# Altium PCB Lamps_board.PcbDoc (part 1 of 2)
Units mm, origin at the board's own origin, x right, y up, seen from the top; angles counter-clockwise.
Board outline 106 x 36 mm, 2 copper layers (Top Layer, Bottom Layer), stack 1.671 mm thick; 111 components, 90 nets, 292 pads, 89 vias.
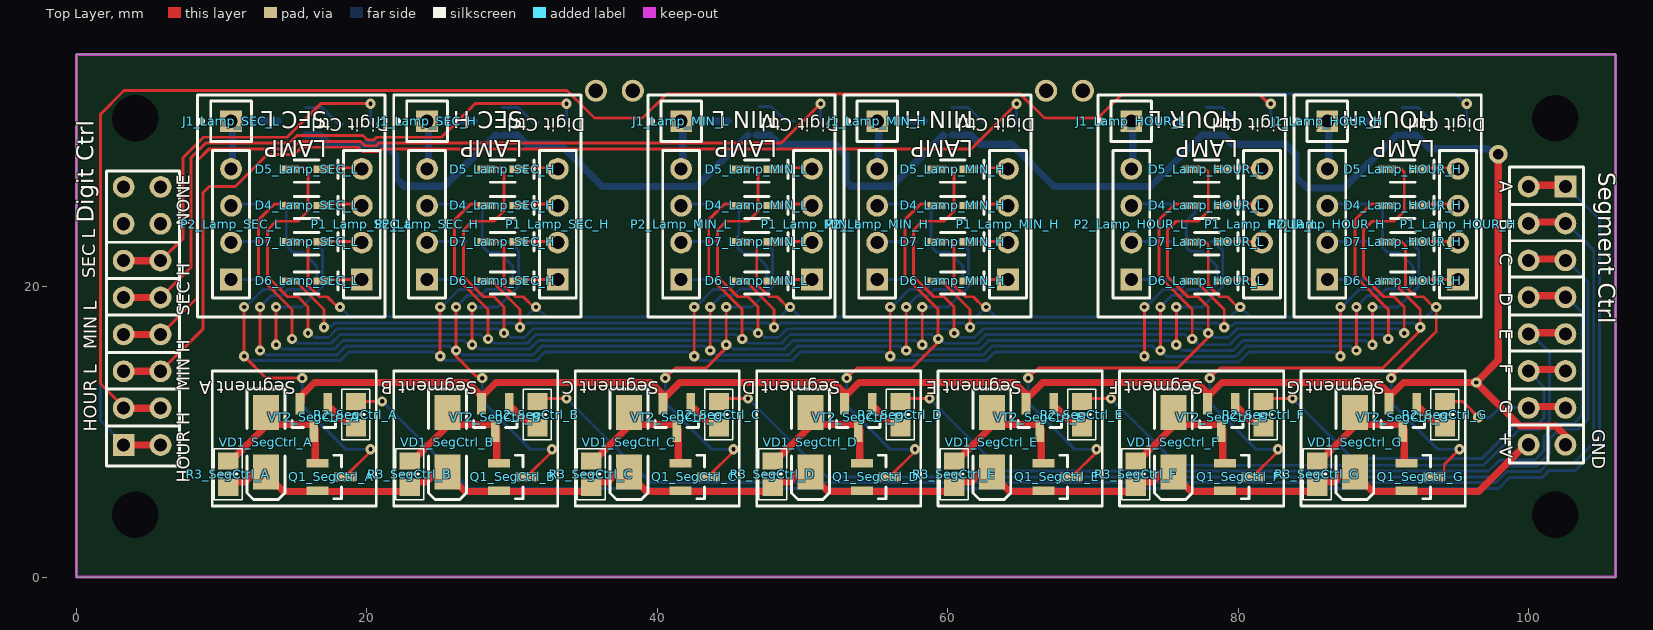
[diagram p0: Top Layer view]
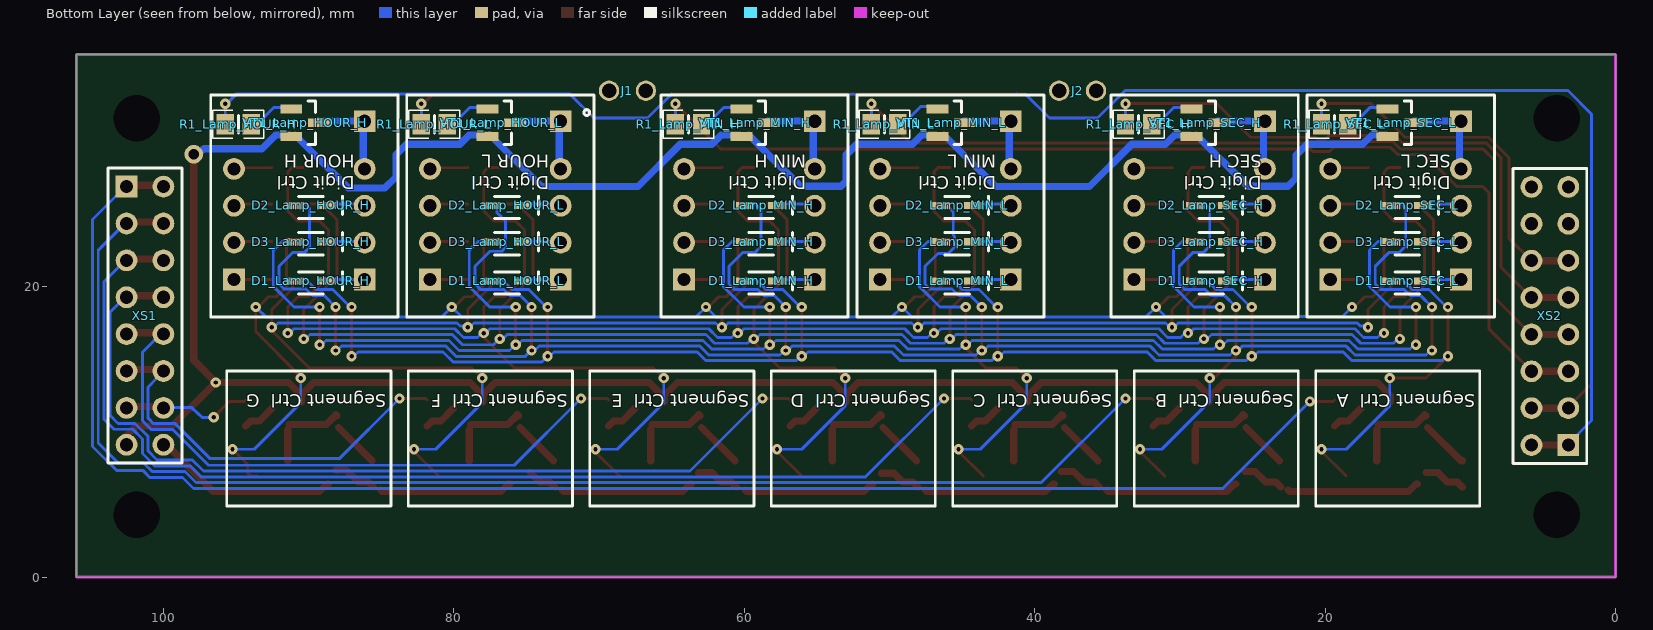
[diagram p1: Bottom Layer view, seen from below]

## Layer stack, top to bottom
Top Solder: solder mask 0.01, Solder Resist, Dk 3.5
Top Layer: signal copper 0.0356
Dielectric 1: dielectric 1.6, FR-4, Dk 4.8
Bottom Layer: signal copper 0.0356
Bottom Solder: solder mask 0.01, Solder Resist, Dk 3.5

## Board outline
0,0 0,36 106,36 106,0

## Design rules (kind name [scope] priority, off if disabled: settings)
BoardOutlineClearance [All] p1: gap=0.2 ignorepadtopadclearanceinfootprint=FALSE
Clearance Pads [InPadClass('FreePads')] p1: gap=1.702 ignorepadtopadclearanceinfootprint=FALSE
Clearance [All] p2: gap=0.2 ignorepadtopadclearanceinfootprint=FALSE
ComponentClearance [All] p1: gap=0.127 collisioncheckmode=3 verticalgap=0.127 showdistances=TRUE
DiffPairsRouting [All] p1: maxlimit=0.254 minlimit=0.127 mostfreqgap=0.127 toplayer_minwidth=0.127 toplayer_maxwidth=25.4 toplayer_prefwidth=0.127 bottomlayer_minwidth=0.127 bottomlayer_maxwidth=25.4 bottomlayer_prefwidth=0.127 maxuncoupledlength=12.7
Height [All] p1: minheight=0 maxheight=1816.048 prefheight=12.7
HoleSize [All] p1: absolutevalues=TRUE maxlimit=6.3 minlimit=0.3 maxpercent=80.000 minpercent=20.000
HoleToHoleClearance [All] p1: gap=0.25 allowstackedmicrovias=FALSE
MinimumAnnularRing [All] p1: minimumring=0.076
MinimumSolderMaskSliver [All] p1: minsoldermaskwidth=0
PlaneClearance [All] p1: clearance=0.127
PlaneConnect PlaneConnectPowerPads [InPadClass('PowerPads')] p1: planeconnectstyle=Direct reliefexpansion=0.508 reliefentries=4 reliefconductorwidth=0.254 reliefairgap=0.254
PlaneConnect [All] p2: pad.planeconnectstyle=Relief pad.reliefexpansion=0.3 pad.reliefentries=4 pad.reliefconductorwidth=0.127 pad.reliefairgap=0.127 via.planeconnectstyle=Direct via.reliefexpansion=0.3 via.reliefentries=4 via.reliefconductorwidth=0.127 via.reliefairgap=0.127
PolygonConnect PolygonConnectPowerPads [All vs (InPadClass('PowerPads'))] p1: connectstyle=Direct reliefconductorwidth=0.254 reliefentries=4 polygonreliefangle="90 Angle" airgapwidth=0.254
PolygonConnect [All] p2: thpad.connectstyle=Relief thpad.reliefconductorwidth=0.635 thpad.reliefentries=4 thpad.polygonreliefangle="90 Angle" thpad.airgapwidth=0.508 smdpad.connectstyle=Relief smdpad.reliefconductorwidth=0.127 smdpad.reliefentries=4 smdpad.polygonreliefangle="90 Angle" smdpad.airgapwidth=0.127 via.connectstyle=Direct via.reliefconductorwidth=0.127 via.reliefentries=4 via.polygonreliefangle="90 Angle" via.airgapwidth=0.127
RoutingVias [All] p1: holewidth=0.3 width=0.6 viastyle="Through Hole" minholewidth=0.3 minwidth=0.6 maxholewidth=0.6 maxwidth=6.6
SilkToSilkClearance [All] p1: silktosilkclearance=0
SilkToSolderMaskClearance [IsPad] p1: minsilkscreentomaskgap=0.127 clearancetoexposedcopper=TRUE
SolderMaskExpansion [All] p1: expansion=0.075
Width [All] p1: maxlimit=25.4 minlimit=0.127 preferedwidth=0.127 minimp=50.000000 maximp=50.000000 favimp=50.000000
20 further rules are at their usual default settings.

## Classes and differential pairs
channel class SegCtrl: SegCtrl_A SegCtrl_B SegCtrl_C SegCtrl_D SegCtrl_E SegCtrl_F SegCtrl_G
channel class Lamp: Lamp_HOUR_H Lamp_HOUR_L Lamp_MIN_H Lamp_MIN_L Lamp_SEC_H Lamp_SEC_L
component class SegCtrl_G: Q1_SegCtrl_G R2_SegCtrl_G R3_SegCtrl_G VD1_SegCtrl_G VT2_SegCtrl_G
component class SegCtrl_F: Q1_SegCtrl_F R2_SegCtrl_F R3_SegCtrl_F VD1_SegCtrl_F VT2_SegCtrl_F
component class SegCtrl_E: Q1_SegCtrl_E R2_SegCtrl_E R3_SegCtrl_E VD1_SegCtrl_E VT2_SegCtrl_E
component class SegCtrl_D: Q1_SegCtrl_D R2_SegCtrl_D R3_SegCtrl_D VD1_SegCtrl_D VT2_SegCtrl_D
component class SegCtrl_C: Q1_SegCtrl_C R2_SegCtrl_C R3_SegCtrl_C VD1_SegCtrl_C VT2_SegCtrl_C
component class SegCtrl_B: Q1_SegCtrl_B R2_SegCtrl_B R3_SegCtrl_B VD1_SegCtrl_B VT2_SegCtrl_B
component class SegCtrl_A: Q1_SegCtrl_A R2_SegCtrl_A R3_SegCtrl_A VD1_SegCtrl_A VT2_SegCtrl_A
component class Lamps_board: J1 XS1 XS2
component class Lamp_SEC_L: D1_Lamp_SEC_L D2_Lamp_SEC_L D3_Lamp_SEC_L D4_Lamp_SEC_L D5_Lamp_SEC_L D6_Lamp_SEC_L D7_Lamp_SEC_L J1_Lamp_SEC_L P1_Lamp_SEC_L P2_Lamp_SEC_L R1_Lamp_SEC_L VT1_Lamp_SEC_L
component class Lamp_SEC_H: D1_Lamp_SEC_H D2_Lamp_SEC_H D3_Lamp_SEC_H D4_Lamp_SEC_H D5_Lamp_SEC_H D6_Lamp_SEC_H D7_Lamp_SEC_H J1_Lamp_SEC_H P1_Lamp_SEC_H P2_Lamp_SEC_H R1_Lamp_SEC_H VT1_Lamp_SEC_H
component class Lamp_MIN_L: D1_Lamp_MIN_L D2_Lamp_MIN_L D3_Lamp_MIN_L D4_Lamp_MIN_L D5_Lamp_MIN_L D6_Lamp_MIN_L D7_Lamp_MIN_L P1_Lamp_MIN_L P2_Lamp_MIN_L R1_Lamp_MIN_L VT1_Lamp_MIN_L
component class Lamp_MIN_H: D1_Lamp_MIN_H D2_Lamp_MIN_H D3_Lamp_MIN_H D4_Lamp_MIN_H D5_Lamp_MIN_H D6_Lamp_MIN_H D7_Lamp_MIN_H J1_Lamp_MIN_H P1_Lamp_MIN_H P2_Lamp_MIN_H R1_Lamp_MIN_H VT1_Lamp_MIN_H
component class Lamp_HOUR_L: D1_Lamp_HOUR_L D2_Lamp_HOUR_L D3_Lamp_HOUR_L D4_Lamp_HOUR_L D5_Lamp_HOUR_L D6_Lamp_HOUR_L D7_Lamp_HOUR_L J1_Lamp_HOUR_L P1_Lamp_HOUR_L P2_Lamp_HOUR_L R1_Lamp_HOUR_L VT1_Lamp_HOUR_L
component class Lamp_HOUR_H: D1_Lamp_HOUR_H D2_Lamp_HOUR_H D3_Lamp_HOUR_H D5_Lamp_HOUR_H D6_Lamp_HOUR_H D7_Lamp_HOUR_H J1_Lamp_HOUR_H P1_Lamp_HOUR_H P2_Lamp_HOUR_H R1_Lamp_HOUR_H VT1_Lamp_HOUR_H

## Components (designator, comment, footprint, x,y, rotation, side; value= is the part's Value field where it differs from the comment)
D1_Lamp_HOUR_H "1A 20V" SOD2512X115N 89.85,20.4 r0 bottom (schematic designator D1)
D1_Lamp_HOUR_L "1A 20V" SOD2512X115N 76.35,20.4 r0 bottom (schematic designator D1)
D1_Lamp_MIN_H "1A 20V" SOD2512X115N 58.85,20.4 r0 bottom (schematic designator D1)
D1_Lamp_MIN_L "1A 20V" SOD2512X115N 45.35,20.4 r0 bottom (schematic designator D1)
D1_Lamp_SEC_H "1A 20V" SOD2512X115N 27.85,20.4 r0 bottom (schematic designator D1)
D1_Lamp_SEC_L "1A 20V" SOD2512X115N 14.35,20.4 r0 bottom (schematic designator D1)
D2_Lamp_HOUR_H "1A 20V" SOD2512X115N 89.85,25.6 r0 bottom (schematic designator D2)
D2_Lamp_HOUR_L "1A 20V" SOD2512X115N 76.35,25.6 r0 bottom (schematic designator D2)
D2_Lamp_MIN_H "1A 20V" SOD2512X115N 58.85,25.6 r0 bottom (schematic designator D2)
D2_Lamp_MIN_L "1A 20V" SOD2512X115N 45.35,25.6 r0 bottom (schematic designator D2)
D2_Lamp_SEC_H "1A 20V" SOD2512X115N 27.85,25.6 r0 bottom (schematic designator D2)
D2_Lamp_SEC_L "1A 20V" SOD2512X115N 14.35,25.6 r0 bottom (schematic designator D2)
D3_Lamp_HOUR_H "1A 20V" SOD2512X115N 89.85,23.1 r0 bottom (schematic designator D3)
D3_Lamp_HOUR_L "1A 20V" SOD2512X115N 76.35,23.1 r0 bottom (schematic designator D3)
D3_Lamp_MIN_H "1A 20V" SOD2512X115N 58.85,23.1 r0 bottom (schematic designator D3)
D3_Lamp_MIN_L "1A 20V" SOD2512X115N 45.35,23.1 r0 bottom (schematic designator D3)
D3_Lamp_SEC_H "1A 20V" SOD2512X115N 27.85,23.1 r0 bottom (schematic designator D3)
D3_Lamp_SEC_L "1A 20V" SOD2512X115N 14.35,23.1 r0 bottom (schematic designator D3)
D4_Lamp_HOUR_H "1A 20V" SOD2512X115N 91.35,25.6 r180 top (schematic designator D4)
D4_Lamp_HOUR_L "1A 20V" SOD2512X115N 77.85,25.6 r180 top (schematic designator D4)
D4_Lamp_MIN_H "1A 20V" SOD2512X115N 60.35,25.6 r180 top (schematic designator D4)
D4_Lamp_MIN_L "1A 20V" SOD2512X115N 46.85,25.6 r180 top (schematic designator D4)
D4_Lamp_SEC_H "1A 20V" SOD2512X115N 29.35,25.6 r180 top (schematic designator D4)
D4_Lamp_SEC_L "1A 20V" SOD2512X115N 15.85,25.6 r180 top (schematic designator D4)
D5_Lamp_HOUR_H "1A 20V" SOD2512X115N 91.35,28.1 r180 top (schematic designator D5)
D5_Lamp_HOUR_L "1A 20V" SOD2512X115N 77.85,28.1 r180 top (schematic designator D5)
D5_Lamp_MIN_H "1A 20V" SOD2512X115N 60.35,28.1 r180 top (schematic designator D5)
D5_Lamp_MIN_L "1A 20V" SOD2512X115N 46.85,28.1 r180 top (schematic designator D5)
D5_Lamp_SEC_H "1A 20V" SOD2512X115N 29.35,28.1 r180 top (schematic designator D5)
D5_Lamp_SEC_L "1A 20V" SOD2512X115N 15.85,28.1 r180 top (schematic designator D5)
D6_Lamp_HOUR_H "1A 20V" SOD2512X115N 91.35,20.4 r180 top (schematic designator D6)
D6_Lamp_HOUR_L "1A 20V" SOD2512X115N 77.85,20.4 r180 top (schematic designator D6)
D6_Lamp_MIN_H "1A 20V" SOD2512X115N 60.35,20.4 r180 top (schematic designator D6)
D6_Lamp_MIN_L "1A 20V" SOD2512X115N 46.85,20.4 r180 top (schematic designator D6)
D6_Lamp_SEC_H "1A 20V" SOD2512X115N 29.35,20.4 r180 top (schematic designator D6)
D6_Lamp_SEC_L "1A 20V" SOD2512X115N 15.85,20.4 r180 top (schematic designator D6)
D7_Lamp_HOUR_H "1A 20V" SOD2512X115N 91.35,23.1 r180 top (schematic designator D7)
D7_Lamp_HOUR_L "1A 20V" SOD2512X115N 77.85,23.1 r180 top (schematic designator D7)
D7_Lamp_MIN_H "1A 20V" SOD2512X115N 60.35,23.1 r180 top (schematic designator D7)
D7_Lamp_MIN_L "1A 20V" SOD2512X115N 46.85,23.1 r180 top (schematic designator D7)
D7_Lamp_SEC_H "1A 20V" SOD2512X115N 29.35,23.1 r180 top (schematic designator D7)
D7_Lamp_SEC_L "1A 20V" SOD2512X115N 15.85,23.1 r180 top (schematic designator D7)
J1 "HDRM2" HDR_M_1X2 68.05,33.5 r180 bottom
J1_Lamp_HOUR_H "Socket" PIN1 86.15,31.4 r90 top (schematic designator J1)
J1_Lamp_HOUR_L "Socket" PIN1 72.65,31.4 r90 top (schematic designator J1)
J1_Lamp_MIN_H "Socket" PIN1 55.15,31.4 r90 top (schematic designator J1)
J1_Lamp_MIN_L "Socket" PIN1 41.65,31.4 r90 top (schematic designator J1)
J1_Lamp_SEC_H "Socket" PIN1 24.15,31.4 r90 top (schematic designator J1)
J1_Lamp_SEC_L "Socket" PIN1 10.65,31.4 r90 top (schematic designator J1)
J2 "HDRM2" HDR_M_1X2 37.05,33.5 r180 bottom
P1_Lamp_HOUR_H "Header 4" HDR1X4 95.15,20.5 r90 top (schematic designator P1)
P1_Lamp_HOUR_L "Header 4" HDR1X4 81.65,20.5 r90 top (schematic designator P1)
P1_Lamp_MIN_H "Header 4" HDR1X4 64.15,20.5 r90 top (schematic designator P1)
P1_Lamp_MIN_L "Header 4" HDR1X4 50.65,20.5 r90 top (schematic designator P1)
P1_Lamp_SEC_H "Header 4" HDR1X4 33.15,20.5 r90 top (schematic designator P1)
P1_Lamp_SEC_L "Header 4" HDR1X4 19.65,20.5 r90 top (schematic designator P1)
P2_Lamp_HOUR_H "Header 4" HDR1X4 86.15,20.5 r90 top (schematic designator P2)
P2_Lamp_HOUR_L "Header 4" HDR1X4 72.65,20.5 r90 top (schematic designator P2)
P2_Lamp_MIN_H "Header 4" HDR1X4 55.15,20.5 r90 top (schematic designator P2)
P2_Lamp_MIN_L "Header 4" HDR1X4 41.65,20.5 r90 top (schematic designator P2)
P2_Lamp_SEC_H "Header 4" HDR1X4 24.15,20.5 r90 top (schematic designator P2)
P2_Lamp_SEC_L "Header 4" HDR1X4 10.65,20.5 r90 top (schematic designator P2)
Q1_SegCtrl_A "P-Ch 100V 270mA" SOT23-3N 17.55,6.9 r0 top (schematic designator Q1)
Q1_SegCtrl_B "P-Ch 100V 270mA" SOT23-3N 30.05,6.9 r0 top (schematic designator Q1)
Q1_SegCtrl_C "P-Ch 100V 270mA" SOT23-3N 42.55,6.9 r0 top (schematic designator Q1)
Q1_SegCtrl_D "P-Ch 100V 270mA" SOT23-3N 55.05,6.9 r0 top (schematic designator Q1)
Q1_SegCtrl_E "P-Ch 100V 270mA" SOT23-3N 67.55,6.9 r0 top (schematic designator Q1)
Q1_SegCtrl_F "P-Ch 100V 270mA" SOT23-3N 80.05,6.9 r0 top (schematic designator Q1)
Q1_SegCtrl_G "P-Ch 100V 270mA" SOT23-3N 92.55,6.9 r0 top (schematic designator Q1)
R1_Lamp_HOUR_H "#NAME?" RESC2012(0805)N 94.85,31.2 r180 bottom (schematic designator R1)
R1_Lamp_HOUR_L "#NAME?" RESC2012(0805)N 81.35,31.2 r180 bottom (schematic designator R1)
R1_Lamp_MIN_H "#NAME?" RESC2012(0805)N 63.85,31.2 r180 bottom (schematic designator R1)
R1_Lamp_MIN_L "#NAME?" RESC2012(0805)N 50.35,31.2 r180 bottom (schematic designator R1)
R1_Lamp_SEC_H "#NAME?" RESC2012(0805)N 32.85,31.2 r180 bottom (schematic designator R1)
R1_Lamp_SEC_L "#NAME?" RESC2012(0805)N 19.35,31.2 r180 bottom (schematic designator R1)
R2_SegCtrl_A "#NAME?" RESC2012(0805)N 19.25,11.2 r270 top (schematic designator R2)
R2_SegCtrl_B "#NAME?" RESC2012(0805)N 31.75,11.2 r270 top (schematic designator R2)
R2_SegCtrl_C "#NAME?" RESC2012(0805)N 44.25,11.2 r270 top (schematic designator R2)
R2_SegCtrl_D "#NAME?" RESC2012(0805)N 56.75,11.2 r270 top (schematic designator R2)
R2_SegCtrl_E "#NAME?" RESC2012(0805)N 69.25,11.2 r270 top (schematic designator R2)
R2_SegCtrl_F "#NAME?" RESC2012(0805)N 81.75,11.2 r270 top (schematic designator R2)
R2_SegCtrl_G "#NAME?" RESC2012(0805)N 94.25,11.2 r270 top (schematic designator R2)
R3_SegCtrl_A "#NAME?" RESC2012(0805)N 10.45,7.1 r270 top (schematic designator R3)
R3_SegCtrl_B "#NAME?" RESC2012(0805)N 22.95,7.1 r270 top (schematic designator R3)
R3_SegCtrl_C "#NAME?" RESC2012(0805)N 35.45,7.1 r270 top (schematic designator R3)
R3_SegCtrl_D "#NAME?" RESC2012(0805)N 47.95,7.1 r270 top (schematic designator R3)
R3_SegCtrl_E "#NAME?" RESC2012(0805)N 60.45,7.1 r270 top (schematic designator R3)
R3_SegCtrl_F "#NAME?" RESC2012(0805)N 72.95,7.1 r270 top (schematic designator R3)
R3_SegCtrl_G "#NAME?" RESC2012(0805)N 85.45,7.1 r270 top (schematic designator R3)
VD1_SegCtrl_A "1A 40V" SMA 13.05,9.3 r270 top (schematic designator VD1)
VD1_SegCtrl_B "1A 40V" SMA 25.55,9.3 r270 top (schematic designator VD1)
VD1_SegCtrl_C "1A 40V" SMA 38.05,9.3 r270 top (schematic designator VD1)
VD1_SegCtrl_D "1A 40V" SMA 50.55,9.3 r270 top (schematic designator VD1)
VD1_SegCtrl_E "1A 40V" SMA 63.05,9.3 r270 top (schematic designator VD1)
VD1_SegCtrl_F "1A 40V" SMA 75.55,9.3 r270 top (schematic designator VD1)
VD1_SegCtrl_G "1A 40V" SMA 88.05,9.3 r270 top (schematic designator VD1)
VT1_Lamp_HOUR_H "TRANS-NPN-BEC" SOT23-3N 90.25,31.3 r180 bottom (schematic designator VT1)
VT1_Lamp_HOUR_L "TRANS-NPN-BEC" SOT23-3N 76.75,31.3 r180 bottom (schematic designator VT1)
VT1_Lamp_MIN_H "TRANS-NPN-BEC" SOT23-3N 59.25,31.3 r180 bottom (schematic designator VT1)
VT1_Lamp_MIN_L "TRANS-NPN-BEC" SOT23-3N 45.75,31.3 r180 bottom (schematic designator VT1)
VT1_Lamp_SEC_H "TRANS-NPN-BEC" SOT23-3N 28.25,31.3 r180 bottom (schematic designator VT1)
VT1_Lamp_SEC_L "TRANS-NPN-BEC" SOT23-3N 14.75,31.3 r180 bottom (schematic designator VT1)
VT2_SegCtrl_A "TRANS-NPN-BEC" SOT23-3N 16.35,11 r270 top (schematic designator VT2)
VT2_SegCtrl_B "TRANS-NPN-BEC" SOT23-3N 28.85,11 r270 top (schematic designator VT2)
VT2_SegCtrl_C "TRANS-NPN-BEC" SOT23-3N 41.35,11 r270 top (schematic designator VT2)
VT2_SegCtrl_D "TRANS-NPN-BEC" SOT23-3N 53.85,11 r270 top (schematic designator VT2)
VT2_SegCtrl_E "TRANS-NPN-BEC" SOT23-3N 66.35,11 r270 top (schematic designator VT2)
VT2_SegCtrl_F "TRANS-NPN-BEC" SOT23-3N 78.85,11 r270 top (schematic designator VT2)
VT2_SegCtrl_G "TRANS-NPN-BEC" SOT23-3N 91.35,11 r270 top (schematic designator VT2)
XS1 "PBD-16" PBD-16-3D 102.55,26.9 r270 bottom
XS2 "PBD-16" PBD-16-3D 3.25,9.1 r90 bottom

## Footprints (in the part's own frame and the unit in brackets; to place one, negate y for a bottom-side part, rotate by r counter-clockwise, add the part's x,y. Pads: shape width x height; smd on the part's side, far side on the other; paste and mask are expansions set on the pad)
HDR1X4 [mm] "Connector; Header; 4 Position"
  rect 1.5x1.5 hole 0.9: 1(0,0)
  round 1.5 hole 0.9: 2(2.54,0) 3(5.08,0) 4(7.62,0)
  silkscreen extent -1.27,-1.27 8.89,1.27
HDR_M_1X2 [mil] "Connector; Header; 2 Position"
  round 55.12 / inner round 55.12 / far side round 60 hole 39.37 mask+3.94: 1(-50,0) 2(50,0)
  silkscreen extent -118,-67 -102,-51, body extent -100,-49 96,49, height 343
PBD-16-3D [mm] "Connector; Header; 8x2 Position"
  rect 1.5x1.5 hole 0.9: 1(0,0)
  round 1.5 hole 0.9: 2(0,2.54) 3(2.54,0) 4(2.54,2.54) 5(5.08,0) 6(5.08,2.54) 7(7.62,0) 8(7.62,2.54) 9(10.16,0) 10(10.16,2.54) 11(12.7,0) 12(12.7,2.54) 13(15.24,0) 14(15.24,2.54) 15(17.78,0) 16(17.78,2.54)
  silkscreen extent -1.27,-1.27 19.05,3.81, body extent -1.27,-1.27 19.05,3.81, height 8.5
PIN1 [mm] "Connector; Plug"
  rect 1.5x1.5 hole 0.9: 1(0,0)
  silkscreen extent -1.4,-1.4 1.4,2.17
RESC2012(0805)N [mm] "Chip Resistor, Body 2.0x1.3mm, IPC Medium Density"
  rect 1.2x1.4 smd: 1(-0.9,0) 2(0.9,0)
  silkscreen extent -1.75,-0.97 1.75,0.97, body extent -1,-0.62 1,0.63, height 0.78
SMA [mm] "DO-214-AC/SMA; 2 C-Bend Leads; Body 5 x 2.7 mm, inc. leads (LxW)"
  rect 2.4x1.8 smd: 1(-2.05,0) 2(2.05,0)
  silkscreen extent -3.65,-1.3 3.95,1.3, body extent -2.75,-1.4 2.75,1.4, height 2.6
SOD2512X115N [mm]
  rect 1.25x0.5 smd: 1(-1.1,0) 2(1.1,0)
  silkscreen extent -2.16,-0.64 0.85,0.9, body extent -1.25,-0.63 1.25,0.63, height 1.15
SOT23-3N [mm] "SOT23, 3-Leads, Body 2.9x1.3mm, Pitch 0.95mm, Lead Span 2.5mm, IPC Medium Density"
  rect 1.5x0.6 smd: 1(-0.95,0.95) 2(-0.95,-0.95) 3(0.95,0)
  silkscreen extent 0.2,-1.5 0.7,1.5, body extent -1.57,-1.5 1.57,1.5, height 1

## Part data
D1_Lamp_HOUR_H D1_Lamp_HOUR_L D1_Lamp_MIN_H D1_Lamp_MIN_L D1_Lamp_SEC_H D1_Lamp_SEC_L D2_Lamp_HOUR_H D2_Lamp_HOUR_L D2_Lamp_MIN_H D2_Lamp_MIN_L D2_Lamp_SEC_H D2_Lamp_SEC_L D3_Lamp_HOUR_H D3_Lamp_HOUR_L D3_Lamp_MIN_H D3_Lamp_MIN_L D3_Lamp_SEC_H D3_Lamp_SEC_L D4_Lamp_HOUR_H D4_Lamp_HOUR_L D4_Lamp_MIN_H D4_Lamp_MIN_L D4_Lamp_SEC_H D4_Lamp_SEC_L D5_Lamp_HOUR_H D5_Lamp_HOUR_L D5_Lamp_MIN_H D5_Lamp_MIN_L D5_Lamp_SEC_H D5_Lamp_SEC_L D6_Lamp_HOUR_H D6_Lamp_HOUR_L D6_Lamp_MIN_H D6_Lamp_MIN_L D6_Lamp_SEC_H D6_Lamp_SEC_L D7_Lamp_HOUR_H D7_Lamp_HOUR_L D7_Lamp_MIN_H D7_Lamp_MIN_L D7_Lamp_SEC_H D7_Lamp_SEC_L: library part B5817WS, "DIODE SCHOTTKY 20V 1A SOD323", Digi-Key Part Number=3191-B5817WSCT-ND, Package=SOD-323, HelpURL=https://www.digikey.com/en/products/detail/yangzhou-yangjie-electronic-technology-co-ltd/B5817WS/13911879, Manufacturer Part Number=B5817WS, Part Number=B5817WS
J1 J2: library part HDR_M_1X2, "CONN, HEADER, Male, pitch: 2.54mm, 2POS"
P1_Lamp_HOUR_H P1_Lamp_HOUR_L P1_Lamp_MIN_H P1_Lamp_MIN_L P1_Lamp_SEC_H P1_Lamp_SEC_L P2_Lamp_HOUR_H P2_Lamp_HOUR_L P2_Lamp_MIN_H P2_Lamp_MIN_L P2_Lamp_SEC_H P2_Lamp_SEC_L: "Header, 4-Pin", LatestRevisionDate=17-Jul-2002, LatestRevisionNote="Re-released for DXP Platform.", Publisher="Altium Limited"
Q1_SegCtrl_A Q1_SegCtrl_B Q1_SegCtrl_C Q1_SegCtrl_D Q1_SegCtrl_E Q1_SegCtrl_F Q1_SegCtrl_G: library part DMP10H4D2S-7, "MOSFET P-CH 100V 270MA SOT23", Package=DMP10H4D2S-7, Part Number=DMP10H4D2S-7
R1_Lamp_HOUR_H R1_Lamp_HOUR_L R1_Lamp_MIN_H R1_Lamp_MIN_L R1_Lamp_SEC_H R1_Lamp_SEC_L R2_SegCtrl_A R2_SegCtrl_B R2_SegCtrl_C R2_SegCtrl_D R2_SegCtrl_E R2_SegCtrl_F R2_SegCtrl_G R3_SegCtrl_A R3_SegCtrl_B R3_SegCtrl_C R3_SegCtrl_D R3_SegCtrl_E R3_SegCtrl_F R3_SegCtrl_G: library part RESC2012(0805), Package=0805, Part Number=RESC2012(0805)
VD1_SegCtrl_A VD1_SegCtrl_B VD1_SegCtrl_C VD1_SegCtrl_D VD1_SegCtrl_E VD1_SegCtrl_F VD1_SegCtrl_G: library part SS14, "Диод Шоттки 1A 40В [SMA / DO-214AC]", HelpURL=http://www.vishay.com/docs/88746/ss12.pdf, Part Number=SS14
VT1_Lamp_HOUR_H VT1_Lamp_HOUR_L VT1_Lamp_MIN_H VT1_Lamp_MIN_L VT1_Lamp_SEC_H VT1_Lamp_SEC_L VT2_SegCtrl_A VT2_SegCtrl_B VT2_SegCtrl_C VT2_SegCtrl_D VT2_SegCtrl_E VT2_SegCtrl_F VT2_SegCtrl_G: library part BC848, HelpURL=http://www.nxp.com/documents/data_sheet/BC848_SER.pdf, Part Number=BC848
XS1 XS2: library part SH2-16G, "CONN RCPT 16POS 0.1 GOLD PCB", Digi-Key Part Number=ED3071-ND, Package="Socket 16POS 2.54mm", HelpURL=https://www.digikey.com/en/products/detail/on-shore-technology-inc/SH2-16G/2721215, Manufacturer Part Number=SH2-16G, Part Number=SH2-16G, Price$=0.20250, System=Connector
J1_Lamp_HOUR_H J1_Lamp_HOUR_L J1_Lamp_MIN_H J1_Lamp_MIN_L J1_Lamp_SEC_H J1_Lamp_SEC_L: LatestRevisionDate=17-Jul-2002, LatestRevisionNote="Re-released for DXP Platform.", Publisher="Altium Limited"

## Free pads (board coordinates)
  round 1.524 hole 3.2 unplated: 5(4.06,4.31) 5(4.06,31.615) 5(101.85,4.31) 5(101.85,31.615)

## Via types
v1: diameter 0.7, hole 0.3, Top Layer to Bottom Layer, 88 vias
v2: diameter 1.27, hole 0.711, Top Layer to Bottom Layer, 1 vias

## Nets (pads, with @x,y where several pads share a name; then routed paths per layer and width w, separated by ;. In a path a pad name is that pad's centre, name@x,y a point inside that pad or via, vN(x,y) a via of type N, cw(c..) or ccw(c..) an arc to the next point about the centre after c; other vN are vias at no path point)
CTRL_A: D1_Lamp_HOUR_H.2 D1_Lamp_HOUR_L.2 D1_Lamp_MIN_H.2 D1_Lamp_MIN_L.2 D1_Lamp_SEC_H.2 D1_Lamp_SEC_L.2 Q1_SegCtrl_A.3 | length 138.3
  Top Layer w0.2: v1(11.55,18.61) v1(11.55,15.21) 13.05,13.71 v1(15.55,13.71) ; Q1_SegCtrl_A.3@18.55,6.96 20.25,8.66 v1(20.25,8.81) ; v1(25.05,15.21) v1(25.05,18.61) ; v1(42.55,15.21) v1(42.55,18.61) ; v1(56.05,15.21) v1(56.05,18.61) ; v1(73.55,15.21) v1(73.55,18.61) ; v1(87.05,15.21) v1(87.05,18.61)
  Bottom Layer w0.2: v1(11.55,15.21) 11.65,15.21 11.95,14.91 18.15,14.91 18.75,15.51 24.615,15.51 24.915,15.21 v1(25.05,15.21) 25.15,15.21 25.45,14.91 31.65,14.91 32.25,15.51 42.115,15.51 42.415,15.21 v1(42.55,15.21) 42.685,15.21 42.985,14.91 49.25,14.91 49.85,15.51 55.615,15.51 55.819,15.306 v1@55.946,15.306 ; v1(11.55,18.61) 11.65,18.61 12.85,19.81 13.997,19.81 14.697,20.51 D1_Lamp_SEC_L.2@14.95,20.51 ; v1(15.55,13.71) 15.55,11.81 18.55,8.81 v1(20.25,8.81) ; v1(25.05,18.61) 25.15,18.61 26.35,19.81 27.499,19.81 28.199,20.51 D1_Lamp_SEC_H.2@28.45,20.51 ; v1(42.55,18.61) 42.65,18.61 43.85,19.81 44.999,19.81 45.699,20.51 D1_Lamp_MIN_L.2@45.95,20.51 ; v1(56.05,15.21) 56.15,15.21 56.45,14.91 62.65,14.91 63.25,15.51 73.115,15.51 73.319,15.306 v1@73.446,15.306 ; v1(56.05,18.61) 56.15,18.61 57.35,19.81 58.499,19.81 59.199,20.51 D1_Lamp_MIN_H.2@59.45,20.51 ; v1(73.55,15.21) 73.95,14.81 80.05,14.81 80.75,15.51 86.615,15.51 86.819,15.306 87.046,15.306 v1@87.05,15.31 ; v1(73.55,18.61) 73.65,18.61 74.85,19.81 75.999,19.81 76.699,20.51 D1_Lamp_HOUR_L.2@76.95,20.51 ; v1(87.05,18.61) 87.15,18.61 88.35,19.81 89.499,19.81 90.199,20.51 D1_Lamp_HOUR_H.2@90.45,20.51
CTRL_B: D2_Lamp_HOUR_H.2 D2_Lamp_HOUR_L.2 D2_Lamp_MIN_H.2 D2_Lamp_MIN_L.2 D2_Lamp_SEC_H.2 D2_Lamp_SEC_L.2 Q1_SegCtrl_B.3 | length 182.2
  Top Layer w0.2: v1(12.65,15.61) v1(12.65,18.61) ; v1(26.15,18.61) v1(26.15,15.61) 26.15,15.21 27.5,13.86 27.8,13.86 v1(27.95,13.71) ; Q1_SegCtrl_B.3@31.05,6.96 32.75,8.66 v1(32.75,8.81) ; v1(43.65,15.61) v1(43.65,18.61) ; v1(57.15,15.61) v1(57.15,18.61) ; v1(74.65,15.61) v1(74.65,18.61) ; v1(88.15,15.61) v1(88.15,18.61)
  Bottom Layer w0.2: v1(12.65,15.61) 12.75,15.61 13.05,15.31 17.95,15.31 18.55,15.91 25.715,15.91 26.015,15.61 v1@26.05,15.61 ; v1(12.65,18.61) 13.45,19.41 14.165,19.41 14.555,19.8 16.158,19.8 16.55,20.192 16.55,21.41 15.587,22.373 14.877,22.373 14.45,22.8 14.45,25.41 14.75,25.71 D2_Lamp_SEC_L.2@15.55,25.71 ; v1(26.15,15.61) 26.25,15.61 26.55,15.31 31.45,15.31 32.05,15.91 43.215,15.91 43.419,15.706 v1@43.546,15.706 ; v1(26.15,18.61) 26.95,19.41 27.86,19.41 28.25,19.8 29.649,19.8 30.05,20.201 30.05,21.41 29.087,22.373 28.364,22.373 27.95,22.787 27.95,25.41 28.25,25.71 D2_Lamp_SEC_H.2@29.05,25.71 ; v1(27.95,13.71) 27.95,12.11 31.25,8.81 v1(32.75,8.81) ; v1(43.65,15.61) 43.75,15.61 44.05,15.31 49.05,15.31 49.65,15.91 56.715,15.91 57.015,15.61 v1@57.05,15.61 ; v1(43.65,18.61) 44.45,19.41 45.26,19.41 45.7,19.85 47.199,19.85 47.55,20.201 47.55,21.41 46.66,22.3 45.988,22.3 ; 45.851,22.399 45.95,22.3 ; 45.851,22.4 45.525,22.726 45.525,23.474 45.612,23.561 45.612,25.147 46.175,25.71 D2_Lamp_MIN_L.2@46.55,25.71 ; v1(57.15,15.61) 57.25,15.61 57.55,15.31 62.45,15.31 63.05,15.91 74.15,15.91 74.45,15.61 v1(74.65,15.61) 74.685,15.61 75.085,15.21 79.85,15.21 80.55,15.91 87.75,15.91 87.915,15.745 87.915,15.71 87.919,15.706 v1@88.046,15.706 ; v1(57.15,18.61) 57.95,19.41 58.665,19.41 59.055,19.8 60.659,19.8 61.05,20.191 61.05,21.41 60.087,22.373 59.251,22.373 58.85,22.774 58.85,25.31 59.25,25.71 D2_Lamp_MIN_H.2@60.05,25.71 ; v1(74.65,18.61) 75.45,19.41 76.165,19.41 76.555,19.8 78.159,19.8 78.55,20.191 78.55,21.41 77.514,22.446 76.704,22.446 76.45,22.7 76.45,24.521 77.025,25.096 77.025,25.56 77.175,25.71 D2_Lamp_HOUR_L.2@77.55,25.71 ; v1(88.15,15.61) v1@88.285,15.61 ; v1(88.15,18.61) 88.94,19.4 89.75,19.4 90.2,19.85 91.699,19.85 92.05,20.201 92.05,21.41 91.087,22.373 90.277,22.373 89.95,22.7 89.95,25.41 90.25,25.71 D2_Lamp_HOUR_H.2@91.05,25.71
CTRL_C: D3_Lamp_HOUR_H.2 D3_Lamp_HOUR_L.2 D3_Lamp_MIN_H.2 D3_Lamp_MIN_L.2 D3_Lamp_SEC_H.2 D3_Lamp_SEC_L.2 Q1_SegCtrl_C.3 | length 152.6
  Top Layer w0.2: v1(13.75,16.01) v1(13.75,18.61) ; v1(27.25,16.01) v1(27.25,18.61) ; v1(40.55,13.71) 41.25,14.41 43.369,14.41 44.654,15.695 44.654,16.006 v1@44.65,16.01 ; Q1_SegCtrl_C.3@43.55,6.96 45.25,8.66 v1(45.25,8.81) ; v1(44.75,16.01) v1(44.75,18.61) ; v1(58.25,16.01) v1(58.25,18.61) ; v1(75.75,16.01) v1(75.75,18.61) ; v1(89.25,16.01) v1(89.25,18.61)
  Bottom Layer w0.2: v1(13.75,16.01) 13.85,16.01 14.15,15.71 17.75,15.71 18.35,16.31 26.731,16.31 v1@27.031,16.01 ; v1(13.75,18.61) 15.534,18.61 16.95,20.026 16.95,22.51 16.35,23.11 16.15,23.11 ; v1(27.25,16.01) 27.385,16.01 27.685,15.71 30.25,15.71 31.216,15.71 31.816,16.31 44.315,16.31 44.615,16.01 v1(44.75,16.01) 44.885,16.01 45.185,15.71 48.75,15.71 49.35,16.31 57.815,16.31 58.115,16.01 v1@58.15,16.01 ; v1(27.25,18.61) 29.025,18.61 30.45,20.035 30.45,22.51 29.85,23.11 29.65,23.11 ; v1(40.55,13.71) 40.55,12.01 43.75,8.81 v1(45.25,8.81) ; v1(44.75,18.61) 46.525,18.61 47.95,20.035 47.95,22.51 47.35,23.11 47.15,23.11 ; v1(58.25,16.01) 58.385,16.01 58.685,15.71 62.25,15.71 62.85,16.31 75.315,16.31 75.615,16.01 v1(75.75,16.01) 75.785,16.01 76.185,15.61 79.65,15.61 80.35,16.31 88.815,16.31 89.019,16.106 89.146,16.106 v1@89.15,16.11 ; v1(58.25,18.61) 60.035,18.61 61.45,20.025 61.45,22.51 60.85,23.11 60.65,23.11 ; v1(75.75,18.61) 77.535,18.61 78.95,20.025 78.95,22.51 78.35,23.11 78.15,23.11 ; v1(89.25,18.61) 91.025,18.61 92.45,20.035 92.45,22.51 91.85,23.11 91.65,23.11
CTRL_COM_HOUR_H: R1_Lamp_HOUR_H.1 XS2.1 XS2.2 | length 126.2
  Top Layer w0.5: XS2.1@3.401,9.101 XS2.2@5.801,9.101
  Bottom Layer w0.2: XS2.1@3.29,9.054 XS2.1@3.29,9.144 ; XS2.1@3.29,9.161 XS2.1@3.29,9.144 ; XS2.1@3.341,8.653 3.341,9.093 3.298,9.136 XS2.1@3.29,9.144 ; XS2.1@3.341,9.161 XS2.1@3.651,8.851 ; 41.271,33.266 41.265,33.26 ; R1_Lamp_HOUR_H.1@95.85,31.21 95.75,31.31 v1(95.75,32.61) 95.648,32.61 94.992,33.266 72.005,33.266 70.354,31.615 66.671,31.615 65.025,33.261 65.025,33.266 65.019,33.26 41.265,33.26 ; XS2.1@3.29,9.144 1.65,10.784 1.65,27.935 1.647,27.938 1.647,31.889 3.278,33.52 33.772,33.52 35.677,31.615 38.985,31.615 40.63,33.26 41.265,33.26
CTRL_COM_HOUR_L: R1_Lamp_HOUR_L.1 XS2.3 XS2.4 | length 109
  Top Layer w0.2: XS2.3@3.044,11.803 3.044,11.93 1.647,13.327 1.647,31.889 3.273,33.515 33.783,33.515 35.683,31.615 38.985,31.615 40.636,33.266 65.02,33.266 66.671,31.615 70.354,31.615 71.999,33.26 81.456,33.26 v1@82.178,32.538
  Top Layer w0.5: XS2.3@3.401,11.641 XS2.4@5.941,11.641
  Bottom Layer w0.2: v1(82.25,32.61) 82.25,31.31 R1_Lamp_HOUR_L.1@82.35,31.21
CTRL_COM_MIN_H: R1_Lamp_MIN_H.1 XS2.5 XS2.6 | length 76.8
  Top Layer w0.2: XS2.6@5.901,13.693 5.901,14.201 5.901,14.279 8.702,17.08 8.702,26.462 9.14,26.9 10.94,26.9 13.14,29.1 15.006,29.1 15.516,29.61 19.399,29.61 19.699,29.31 20.85,29.31 21.04,29.5 61.64,29.5 v1(64.75,32.61)
  Top Layer w0.5: XS2.5@3.401,14.181 5.881,14.181 XS2.6@5.901,14.201
  Bottom Layer w0.2: v1@64.75,32.71 v1(64.75,32.61) 64.75,31.31 R1_Lamp_MIN_H.1@64.85,31.21
CTRL_COM_MIN_L: R1_Lamp_MIN_L.1 XS2.7 XS2.8 | length 62
  Top Layer w0.2: XS2.8@5.801,16.293 5.801,16.719 8.302,19.22 8.302,28.662 9.14,29.5 14.84,29.5 15.35,30.01 19.565,30.01 19.865,29.71 20.635,29.71 20.825,29.9 48.54,29.9 v1(51.25,32.61)
  Top Layer w0.5: XS2.7@3.401,16.721 5.721,16.721 XS2.8@5.801,16.801
  Bottom Layer w0.2: v1@51.25,32.51 51.25,31.31 R1_Lamp_MIN_L.1@51.35,31.21
CTRL_COM_SEC_H: R1_Lamp_SEC_H.1 XS2.9 XS2.10 | length 42.3
  Top Layer w0.2: XS2.10@5.838,18.788 5.838,19.296 7.902,21.36 7.902,28.896 8.906,29.9 14.674,29.9 15.184,30.41 19.731,30.41 20.031,30.11 20.469,30.11 20.659,30.3 25.14,30.3 27.45,32.61 v1(33.75,32.61)
  Top Layer w0.5: XS2.9@3.401,19.261 5.661,19.261 XS2.10@5.701,19.301
  Bottom Layer w0.2: v1@33.75,32.51 33.75,31.31 R1_Lamp_SEC_H.1@33.85,31.21
CTRL_COM_SEC_L: R1_Lamp_SEC_L.1 XS2.11 XS2.12 | length 26.3
  Top Layer w0.2: XS2.12@5.838,21.328 5.838,21.836 7.35,23.348 7.35,28.91 8.74,30.3 14.509,30.3 16.819,32.61 v1(20.25,32.61) ; XS2.12@5.901,21.701 XS2.12@5.901,21.801
  Top Layer w0.5: XS2.11@3.401,21.801 XS2.12@5.601,21.801
  Bottom Layer w0.2: v1@20.25,32.51 20.25,31.31 R1_Lamp_SEC_L.1@20.35,31.21
CTRL_D: D4_Lamp_HOUR_H.2 D4_Lamp_HOUR_L.2 D4_Lamp_MIN_H.2 D4_Lamp_MIN_L.2 D4_Lamp_SEC_H.2 D4_Lamp_SEC_L.2 Q1_SegCtrl_D.3 | length 163.5
  Top Layer w0.2: D4_Lamp_SEC_L.2@14.35,25.81 14.35,25.735 14.325,25.71 13.65,25.71 12.55,24.61 12.55,20.735 14.85,18.435 v1(14.85,16.41) ; D4_Lamp_SEC_H.2@27.85,25.735 27.825,25.71 27.15,25.71 26.05,24.61 26.05,20.735 28.35,18.435 v1(28.35,16.41) ; D4_Lamp_MIN_L.2@45.35,25.735 45.325,25.71 44.65,25.71 43.55,24.61 43.55,20.735 45.85,18.435 v1(45.85,16.41) ; v1(53.05,13.71) 53.75,14.41 57.569,14.41 v1@59.254,16.095 ; Q1_SegCtrl_D.3@56.05,6.96 57.75,8.66 v1(57.75,8.81) ; D4_Lamp_MIN_H.2@58.85,25.735 58.825,25.71 58.15,25.71 57.05,24.61 57.05,20.735 59.35,18.435 v1(59.35,16.41) ; D4_Lamp_HOUR_L.2@76.35,25.735 76.325,25.71 75.65,25.71 74.55,24.61 74.55,20.735 76.85,18.435 v1(76.85,16.41) ; D4_Lamp_HOUR_H.2@89.85,25.735 89.825,25.71 89.15,25.71 88.05,24.61 88.05,20.735 90.35,18.435 v1(90.35,16.41)
  Bottom Layer w0.2: v1(14.85,16.41) 14.985,16.41 15.285,16.11 17.55,16.11 18.15,16.71 27.831,16.71 v1@28.131,16.41 ; v1(28.35,16.41) 28.45,16.41 28.75,16.11 31.05,16.11 31.65,16.71 45.415,16.71 v1@45.619,16.506 ; v1(45.85,16.41) 45.95,16.41 46.25,16.11 48.55,16.11 49.15,16.71 58.915,16.71 v1@59.119,16.506 ; v1(53.05,13.71) 53.05,11.81 56.05,8.81 v1(57.75,8.81) ; v1(59.35,16.41) 59.485,16.41 59.785,16.11 62.05,16.11 62.65,16.71 76.331,16.71 76.631,16.41 v1(76.85,16.41) 76.885,16.41 77.285,16.01 79.416,16.01 80.116,16.71 89.915,16.71 90.215,16.41 v1(90.35,16.41)
CTRL_E: D5_Lamp_HOUR_H.2 D5_Lamp_HOUR_L.2 D5_Lamp_MIN_H.2 D5_Lamp_MIN_L.2 D5_Lamp_SEC_H.2 D5_Lamp_SEC_L.2 Q1_SegCtrl_E.3 | length 197
  Top Layer w0.2: D5_Lamp_SEC_L.2@14.85,28.21 15.65,28.21 15.95,27.91 15.95,25.21 15.25,24.51 13.75,24.51 13.15,23.91 13.15,20.701 14.541,19.31 15.25,19.31 15.95,18.61 v1(15.95,16.81) ; D5_Lamp_SEC_H.2@28.35,28.21 29.15,28.21 29.45,27.91 29.45,25.21 28.75,24.51 27.25,24.51 26.65,23.91 26.65,20.701 28.041,19.31 28.75,19.31 29.45,18.61 v1(29.45,16.81) ; D5_Lamp_MIN_L.2@45.85,28.21 46.65,28.21 46.95,27.91 46.95,25.21 46.25,24.51 44.75,24.51 44.15,23.91 44.15,20.701 45.541,19.31 46.25,19.31 46.95,18.61 v1(46.95,16.81) ; D5_Lamp_MIN_H.2@59.35,28.21 60.15,28.21 60.45,27.91 60.45,25.21 59.75,24.51 58.25,24.51 57.65,23.91 57.65,20.701 59.041,19.31 59.75,19.31 60.45,18.61 v1(60.45,16.81) ; v1(65.55,13.71) 66.25,14.41 75.85,14.41 v1@77.95,16.51 ; Q1_SegCtrl_E.3@68.55,6.96 68.6,6.96 70.25,8.61 v1(70.25,8.81) ; D5_Lamp_HOUR_L.2@76.85,28.21 77.65,28.21 77.95,27.91 77.95,25.21 77.25,24.51 75.75,24.51 75.15,23.91 75.15,20.701 76.541,19.31 77.25,19.31 77.95,18.61 v1(77.95,16.81) ; D5_Lamp_HOUR_H.2@90.35,28.21 91.15,28.21 91.45,27.91 91.45,25.21 90.75,24.51 89.25,24.51 88.65,23.91 88.65,20.701 90.041,19.31 90.75,19.31 91.45,18.61 v1(91.45,16.81)
  Bottom Layer w0.2: v1(15.95,16.81) 16.085,16.81 16.385,16.51 17.35,16.51 17.95,17.11 29.05,17.11 29.281,16.879 v1@29.419,16.879 ; v1(29.45,16.81) 29.585,16.81 29.685,16.71 29.75,16.71 29.95,16.51 30.85,16.51 31.45,17.11 46.45,17.11 46.681,16.879 46.819,16.879 v1@46.846,16.906 ; v1(46.95,16.81) 47.085,16.81 47.385,16.51 48.35,16.51 48.95,17.11 60.015,17.11 60.315,16.81 v1(60.45,16.81) 60.585,16.81 60.885,16.51 61.85,16.51 62.45,17.11 77.515,17.11 77.719,16.906 v1@77.846,16.906 ; v1(65.55,13.71) 65.55,12.01 68.75,8.81 v1(70.25,8.81) ; v1(77.95,16.81) 78.085,16.81 78.385,16.51 79.35,16.51 79.95,17.11 91.015,17.11 91.219,16.906 91.346,16.906 v1@91.35,16.91